# Altium PCB 数控电源.PcbDoc (part 2 of 4)
Units mm, origin at the board's own origin, x right, y up, seen from the top; angles counter-clockwise.
Board outline 99.32 x 99.37 mm, 4 copper layers (Top Layer 1, GND, POWER, Bottom Layer), stack 0.603 mm thick; 325 components, 180 nets, 929 pads, 616 vias.
Unrouted connection lines stored in the file: 13.
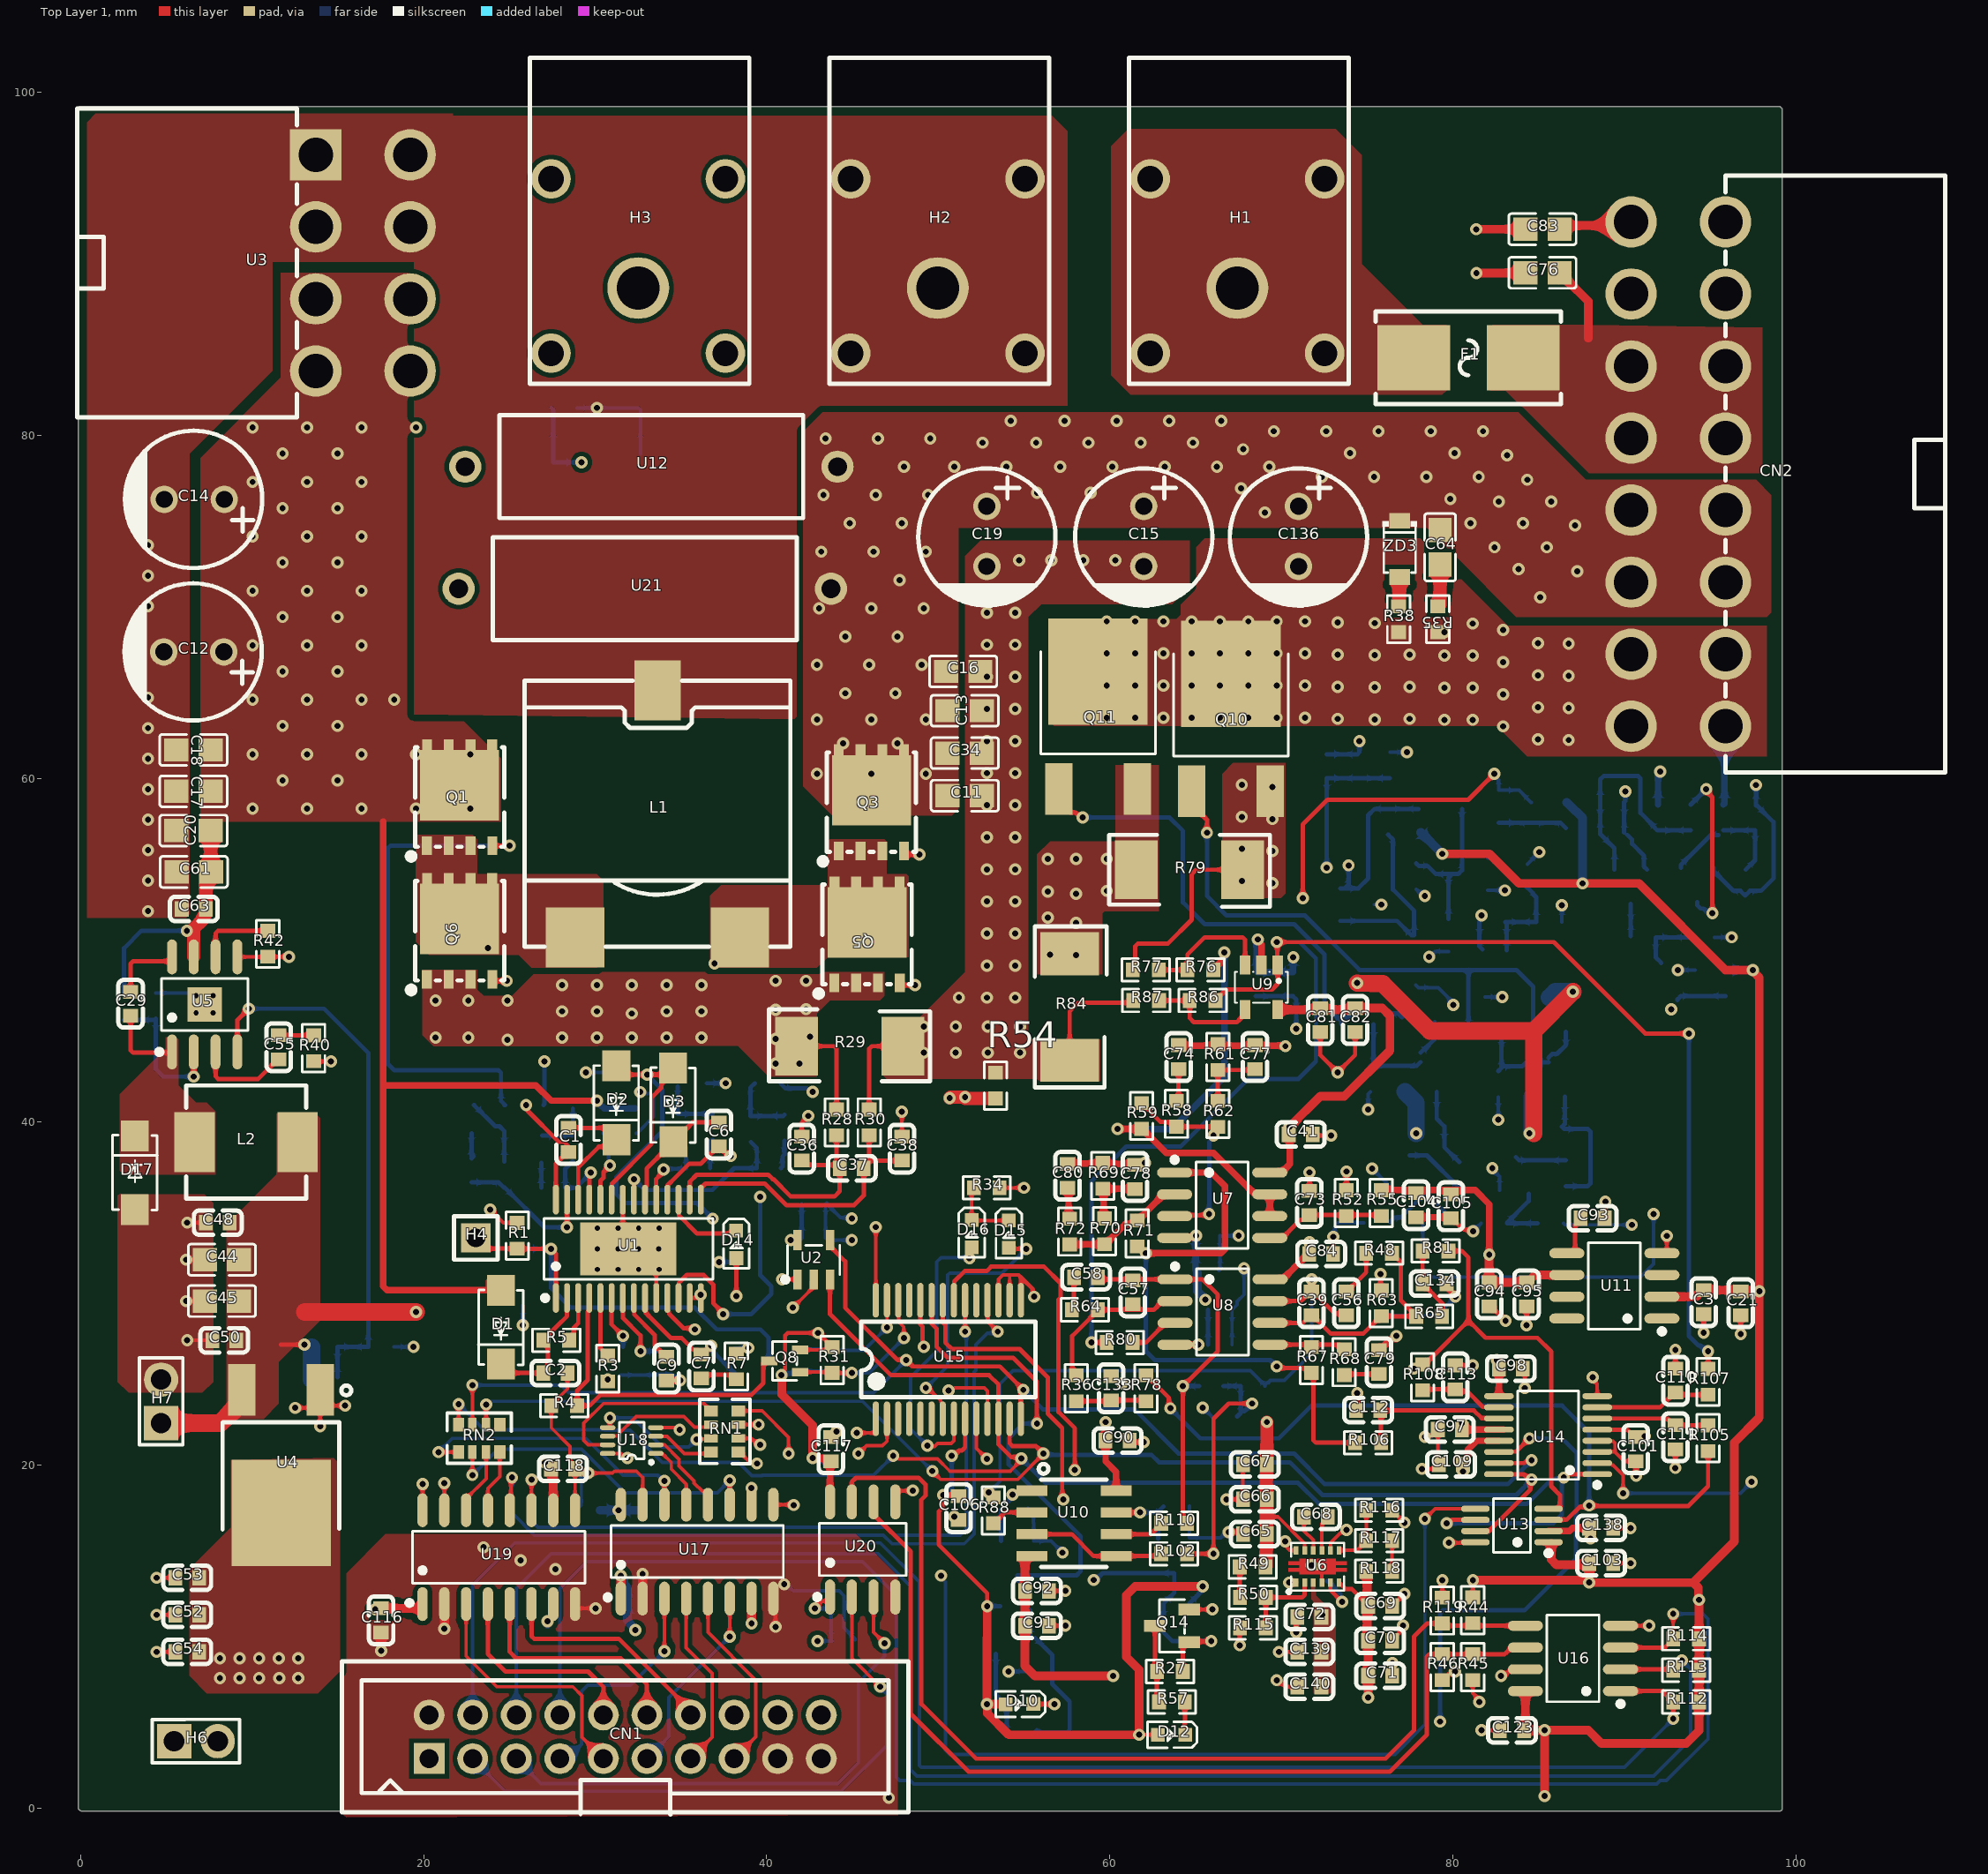
[diagram p0: Top Layer 1 view]

## Part data (continued)
U6: "LM27762 带有集成 LDO 的低噪声正负输出电荷泵", JLCPCB Part Class="Extended Part", LCSC Part Name=低噪声正负输出集成电荷泵加LDO, Manufacturer=TI(德州仪器), ManufacturerPart=LM27762DSSR, Operating Temperature=-40℃~+85℃, Operating Voltage=2.7V~5.5V, Output Current=250mA, Output Resistance=2.5Ω, Output Voltage=-5V~-1.5V；1.5V~5V, Quiescent Current=390uA, Switching Frequency=2MHz, AddInBom=yes, ConvertToPcb=yes, Datasheet=https://www.ti.com/cn/lit/ds/symlink/lm27762.pdf, Energy Efficiency=-, Features=自适应开关频率；过流保护；低纹波/低噪声架构；输出短路保护；低功耗待机, FootprintName=WSON-12_L3.0-W2.0-P0.50-BL-EP, Function=反相, ModelId=75df7d26feb145b0ac5ce3287ea6d356, ModelName=WSON-12_L3.0-W2.0-H0.8-P0.50, ModelTransform=79.527,118.8974,0,90,0,0,0,0,0, PFM Mode=支持, Supplier=LCSC, Supplier Footprint=WSON-12-EP(2x3), SupplierPart=C473398, Symbol=LM27762DSSR
U7: "放大器数:双路;增益带宽积(GBP):10MHz;输入偏置电流(Ib):5pA;输入失调电压(Vos):-;压摆率(SR):20V/us;轨到轨:轨到轨输入,轨到轨输出;", Ib - Input Bias Current=5pA, JLCPCB Part Class="Extended Part", LCSC Part Name=OPA2192IDR, Manufacturer=TI(德州仪器), Operating Temperature=-40℃~+125℃, Output Current=65mA, Quiescent Current(Iq)=1mA, Vos - Input Offset Voltage=-, AddInBom=yes, Common Mode Rejection Ratio(CMRR)=-, ConvertToPcb=yes, Datasheet=https://www.ti.com/cn/lit/gpn/opa2192, FootprintName=SOIC-8_L4.9-W3.9-P1.27-LS6.0-BL, Gain Bandwidth Product=10MHz, ManufacturerPart=OPA2192IDR, ModelId=e81d2f7d937b4a6ab1dca543ff5d56a4, ModelName=SOIC-8_L4.9-W3.9-H1.7-LS6.0-P1.27, ModelTransform=192.913,236.22,0,0,0,0,0,0,0, Number of Channels=双路, Rail to Rail=轨到轨输入,轨到轨输出, Slew Rate=20V/us, Supplier=LCSC, Supplier Footprint=SOIC-8, SupplierPart=C110074, Symbol=OPA2192IDR
U8: library part opa2376aidr_1, "放大器数:双路;增益带宽积(GBP):5.5MHz;输入偏置电流(Ib):0.2pA;压摆率(SR):2V/us;轨到轨:-;", Current - Input Bias(Ib)=0.2pA, JLCPCB Part Class="Extended Part", LCSC Part Name=OPA2376AIDR, Manufacturer=TI(德州仪器), Operating Temperature=-40℃~+125℃, Output Current=50mA, Supply Current=760uA, AddInBom=yes, ConvertToPcb=yes, Datasheet=https://www.ti.com/cn/lit/gpn/opa376, FootprintName=SOIC-8_L4.9-W3.9-P1.27-LS6.0-BL, Gain Bandwidth Product(GBP)=5.5MHz, ManufacturerPart=OPA2376AIDR, ModelId=e81d2f7d937b4a6ab1dca543ff5d56a4, ModelName=SOIC-8_L4.9-W3.9-H1.7-LS6.0-P1.27, ModelTransform=192.913,236.22,0,0,0,0,0,0,0, Number of Circuits=双路, Output Type=-, Rail to Rail=-, Slew Rate(SR)=2V/us, Supplier=LCSC, Supplier Footprint=SOIC-8, SupplierPart=C46316, Symbol=OPA2376AID
U9: "放大器数:单路;增益带宽积(GBP):10MHz;输入偏置电流(Ib):30pA;输入失调电压(Vos):250nV;压摆率(SR):5V/us;轨到轨:轨到轨输入,轨到轨输出;", Ib - Input Bias Current=30pA, Input Offset Current(Ios)=700pA, Input Offset Voltage Drift(Vos TC)=5nV/℃, JLCPCB Part Class="Extended Part", LCSC Part Name=自动、精密、零漂移、零交叉、真正的轨至轨输入/输出运算放大器, Manufacturer=TI(德州仪器), ManufacturerPart=OPA388QDBVRQ1, Maximum Power Supply Range (Vdd-Vss)=5.5V, Operating Temperature=-40℃~+125℃, Output Current=60mA, Quiescent Current(Iq)=1.9mA, Vos - Input Offset Voltage=250nV, AddInBom=yes, Common Mode Rejection Ratio(CMRR)=140dB, ConvertToPcb=yes, Datasheet=https://www.ti.com/cn/lit/gpn/opa388-q1, Dual Supply=1.25V~2.75V；-2.75V~-1.25V, Features=EMI滤波/RF抑制；零漂移/自动稳零；过压保护, FootprintName=SOT-23-5_L3.0-W1.7-P0.95-LS2.8-BR, Gain Bandwidth Product=10MHz, ModelId=0a2a1b8f50944f73965918ad6e5fe167, ModelName=SOT-23-5_L2.9-W1.6-H1.1-LS2.8-P0.95, ModelTransform=114.173,109.636,0,180,0,0,0,0,0, Noise density(eN)=7nV/√Hz@1kHz, Number of Channels=单路, Rail to Rail=轨到轨输入,轨到轨输出, Single Supply=2.5V~5.5V, Slew Rate=5V/us, Supplier=LCSC, Supplier Footprint=SOT-23-5, SupplierPart=C2871496, Symbol=OPA388QDBVRQ1
U10: "比较器数:双路;输入失调电压(Vos):1mV;输入偏置电流(Ib):20nA;", Ib - Input Bias Current=20nA, Input Offset Current(Ios)=3nA, JLCPCB Part Class="Extended Part", LCSC Part Name=低功耗双电压比较器, Manufacturer=ST(意法半导体), ManufacturerPart=LM293D, Maximum Power Supply Range (Vdd-Vss)=36V, Operating Temperature=-40℃~+105℃, Quiescent Current=450uA, Vos - Input Offset Voltage=1mV, AddInBom=yes, Common Mode Rejection Ratio(CMRR)=-, ConvertToPcb=yes, Datasheet=https://item.szlcsc.com/datasheet/LM293D/269222.html, Dual Supply=1V~18V；-18V~-1V, Features=-, FootprintName=SO-8_L4.9-W3.9-P1.27-LS6.0-BL, ModelId=50ce3402a2354e6c8e8bd1c9ad02453e, ModelName=SO-8_L4.9-W3.9-P1.27-LS6.0-BL, ModelTransform=192.913,236.22,0,0,0,0,0,0,0, Number of Channels=双路, Output Mode=MOS；CMOS；ECL；DTL；TTL, Output Type=-, Propagation Delay Time=1.3us, Response Time (tr)=1.3us, Single Supply=2V~36V, Supplier=LCSC, Supplier Footprint=SO-8, SupplierPart=C283313, Symbol=LM293D_C283313
U11: "输出类型:固定;输入电压:2.7V~18V;输出电压:2.5V;输出电流:10mA;精度:±0.05%;", Input Voltage=2.7V~18V, JLCPCB Part Class="Extended Part", LCSC Part Name=REF5025IDR, Manufacturer=TI(德州仪器), Operating Temperature=-40℃~+125℃@(Ta), Output Current=10mA, Output Voltage=2.5V, Supply Current=1.2mA, Temperature Coefficient=3ppm/℃, Tolerance=±0.05%, AddInBom=yes, ConvertToPcb=yes, Datasheet=https://www.ti.com/cn/lit/gpn/ref5030, FootprintName=SOIC-8_L4.9-W3.9-P1.27-LS6.0-BL, ManufacturerPart=REF5025IDR, ModelId=e81d2f7d937b4a6ab1dca543ff5d56a4, ModelName=SOIC-8_L4.9-W3.9-H1.7-LS6.0-P1.27, ModelTransform=192.913,236.22,0,0,0,0,0,0,0, Noise - 1/10Hz to 10Hz=3uVp-p, Noise - 10Hz to 10kHz=-, Output Type=固定, Reference Type=串联, Supplier=LCSC, Supplier Footprint=SOIC-8, SupplierPart=C544535, Symbol=REF5025IDR
U12 U21: "电阻类型:金属氧化膜电阻;阻值:100Ω;精度:±5%;功率:5W;温度系数:±700ppm/℃;", JLCPCB Part Class="Extended Part", LCSC Part Name="金属氧化膜电阻 100Ω ±5% 5W", Manufacturer=华星机电, ManufacturerPart=MOF5WS-100Ω±5%T, Power(Watts)=5W, Temperature Coefficient=±700ppm/℃, Tolerance=±5%, AddInBom=yes, ConvertToPcb=yes, Datasheet=https://item.szlcsc.com/datasheet/MOF5WS-100%25CE%25A9%25C2%25B15%2525T/754813.html, FootprintName=RES-TH_BD6.0-L17.5-P21.50-D0.7, ModelId=a7638b0f76d54b0db5a676fc97b6c5ec, ModelName=RES-TH_BD6.0-L17.5-P21.50-D0.7, ModelTransform=873.2266,236.22,0,0,0,0,-0.005,0,-196.85, Supplier=LCSC, Supplier Footprint=插件,D6xL17.5mm, SupplierPart=C714488, Symbol=MOF5WS-100Ω±5%T, Type=金属氧化膜电阻
U13: "分辨率(位):16位;接口类型:SPI;工作电压:2.7V~5.5V;稳定时间:10us;积分非线性:4LSB;", JLCPCB Part Class="Extended Part", LCSC Part Name=16位、双通道、电压输出数模转换器, Manufacturer=TI(德州仪器), ManufacturerPart=DAC8552IDGKR, Operating Temperature=-40℃~+105℃, Power-On Reset=内置, Quiescent Current (Iq)=700nA, Voltage - Supply=2.7V~5.5V, Voltage Reference=外置, Voltage Reference Drift=-, AddInBom=yes, ConvertToPcb=yes, Data Rate=-, Datasheet=https://www.ti.com/cn/lit/gpn/dac8552, FootprintName=VSSOP-8_L3.0-W3.0-P0.65-LS5.0-BL, Integral non - linearity=4LSB, Interface=SPI, ModelId=fe8ada2663e64b00b932016623def703, ModelName=VSSOP-8_L3.0-W3.0-H1.1-LS4.9-P0.65, ModelTransform=197.34433,118.11,0,90,0,0,0,0.0005,0, Number of Channels=2, Output Type=电压-缓冲, Resolution(Bits)=16位, Sampling Rate=-, Settling Time=10us, Supplier=LCSC, Supplier Footprint=MSOP-8, SupplierPart=C136020, Symbol=DAC8552IDGKR
U14: "分辨率(位):16;采样率:2kHz;工作电压:2.3V~5.5V;接口类型:SPI;", Clock Frequency=500kHz~4.5MHz；4.096MHz, JLCPCB Part Class="Extended Part", LCSC Part Name=4通道、2kSPS、低功耗、16位ADC，具有集成PGA和基准, Manufacturer=TI(德州仪器), ManufacturerPart=ADS1120IPWR, Operating Temperature=-40℃~+125℃, Quiescent Current (Iq)=120uA, Temperature Sensors=内置, Voltage - Supply=2.3V~5.5V, Voltage Reference Drift=5ppm/℃, ADC architecture=Sigma-Delta, AddInBom=yes, Clock/Oscillator=内置, ConvertToPcb=yes, Data Rate=660Hz；350Hz；2kHz；1.2kHz；180Hz；90Hz, Datasheet=https://www.ti.com/cn/lit/gpn/ads1120, differential input=是, FootprintName=TSSOP-16_L5.0-W4.4-P0.65-LS6.4-BL, Full-Scale Range(FSR)=-, Integral non - linearity=-, Interface=SPI, ModelId=e184b9ae7def452b81228c95a013214c, ModelName=TSSOP-16_L5.0-W4.4-H1.0-LS6.4-P0.65, ModelTransform=252.188,196.85,0,90,0,0,0,0.005,0, Number of Channels=4, Programmable Gain=支持, Resolution (Bits)=16, Sampling Rate=2kHz, Signal-to-Noise Ratio=-, Supplier=LCSC, Supplier Footprint=TSSOP-16, SupplierPart=C84284, Symbol=ADS1120IPWR, Voltage Reference=内置
U15: "接口类型:SPI;I/O数量:16;时钟频率(fc):10MHz;", Clock Frequency=10MHz, Current - Output High(IOH)=3mA, Current - Output Low(IOL)=8mA, JLCPCB Part Class="Extended Part", LCSC Part Name=带有串行接口的16位I/O扩展器, Manufacturer=MICROCHIP(美国微芯), ManufacturerPart=MCP23S17-E/SS, Operating Temperature=-40℃~+125℃, Quiescent Supply Current=1uA, Voltage - Supply=1.8V~5.5V, AddInBom=yes, ConvertToPcb=yes, Datasheet=https://item.szlcsc.com/datasheet/MCP23S17-E%252FSS/159342.html, Features=复位功能；级联与地址扩展, FootprintName=SSOP-28_L10.2-W5.3-P0.65-LS7.8-BL, Interface=SPI, Interrupt Output=有中断输出, ModelId=0c45916be1b748f191431a304285089a, ModelName=SSOP-28_L10.2-W5.3-H2.0-LS7.8-P0.65, ModelTransform=401.574,307.086,0,0,0,0,0,0,0, Number of I/O=16, Number of Supporting Devices=8, Output Logic Level - High=-, Output Logic Level - Low=600mV, Output Type=-, Supplier=LCSC, Supplier Footprint=SSOP-28-208mil, SupplierPart=C148009, Symbol=MCP23S17-E/SS
U16: "接口类型:I2C;存储容量:32Kbit;时钟频率(fc):1MHz;", Clock Frequency=1MHz, JLCPCB Part Class="Extended Part", LCSC Part Name="32 Kbit串行I2C总线EEPROM", Manufacturer=ST(意法半导体), ManufacturerPart=M24C32-WMN6P, Operating Temperature=-40℃~+85℃, Voltage - Supply=2.5V~5.5V, AddInBom=yes, ConvertToPcb=yes, Data Retention - TDR (Year)=200年, Datasheet=https://item.szlcsc.com/datasheet/M24C32-WMN6P/1443432.html, Features=内置上电复位(POR)；硬件写保护功能；内置错误纠正码(ECC)功能, FootprintName=SOIC-8_L4.9-W3.9-P1.27-LS6.0-BL, Interface=I2C, Memory Size=32Kbit, ModelId=e81d2f7d937b4a6ab1dca543ff5d56a4, ModelName=SOIC-8_L4.9-W3.9-H1.7-LS6.0-P1.27, ModelTransform=192.913,236.22,0,0,0,0,0,0,0, Supplier=LCSC, Supplier Footprint=SOIC-8, SupplierPart=C1353147, Symbol=M24C32-WMN6P, Write Cycle Endurance=400万次, Write Cycle Time(Tw)=5ms
U17 U19: Isolation Voltage(Vrms)=2500, JLCPCB Part Class="Extended Part", LCSC Part Name=SI8641BB-B-IS1R, Manufacturer="SKYWORKS/SILICON LABS(芯科)", Operating Temperature=-40℃~+125℃, Voltage - Supply(VCCA)=2.375V~5.5V, AddInBom=yes, CMTI(kV/us)=50kV/us, ConvertToPcb=yes, Data Rate(Max)=150Mbps, Datasheet=https://item.szlcsc.com/datasheet/SI8641BB-B-IS1R/466372.html, Default Output=低电平, Features=-, FootprintName=SOIC-16_L9.9-W3.9-P1.27-LS6.0-BL, ManufacturerPart=SI8641BB-B-IS1R, ModelId=c21ec766ec2643efb3352f8441994f4e, ModelName=SOIC-16_L9.9-W3.9-H1.8-LS6.0-P1.27, ModelTransform=389.763,236.454,0,0,0,0,0,0,0, Number of Forward Channels=3, Number of Reverse Channels=1, Propagation Delay(tpd)=-, Supplier=LCSC, Supplier Footprint=SOIC-16, SupplierPart=C461889, Symbol=SI8641BB-B-IS1R, Voltage - Supply(VCCB)=2.375V~5.5V